# Altium PCB PCB1.pcbdoc (part 2 of 3)
Units mil, origin at the board's own origin, x right, y up, seen from the top; angles counter-clockwise.
Board outline 3937.01 x 3937.01 mil, 6 copper layers (Top Layer, Inner1, Inner2, Inner3, Inner4, Bottom Layer), stack 60.565 mil thick; 226 components, 112 nets, 767 pads, 893 vias.
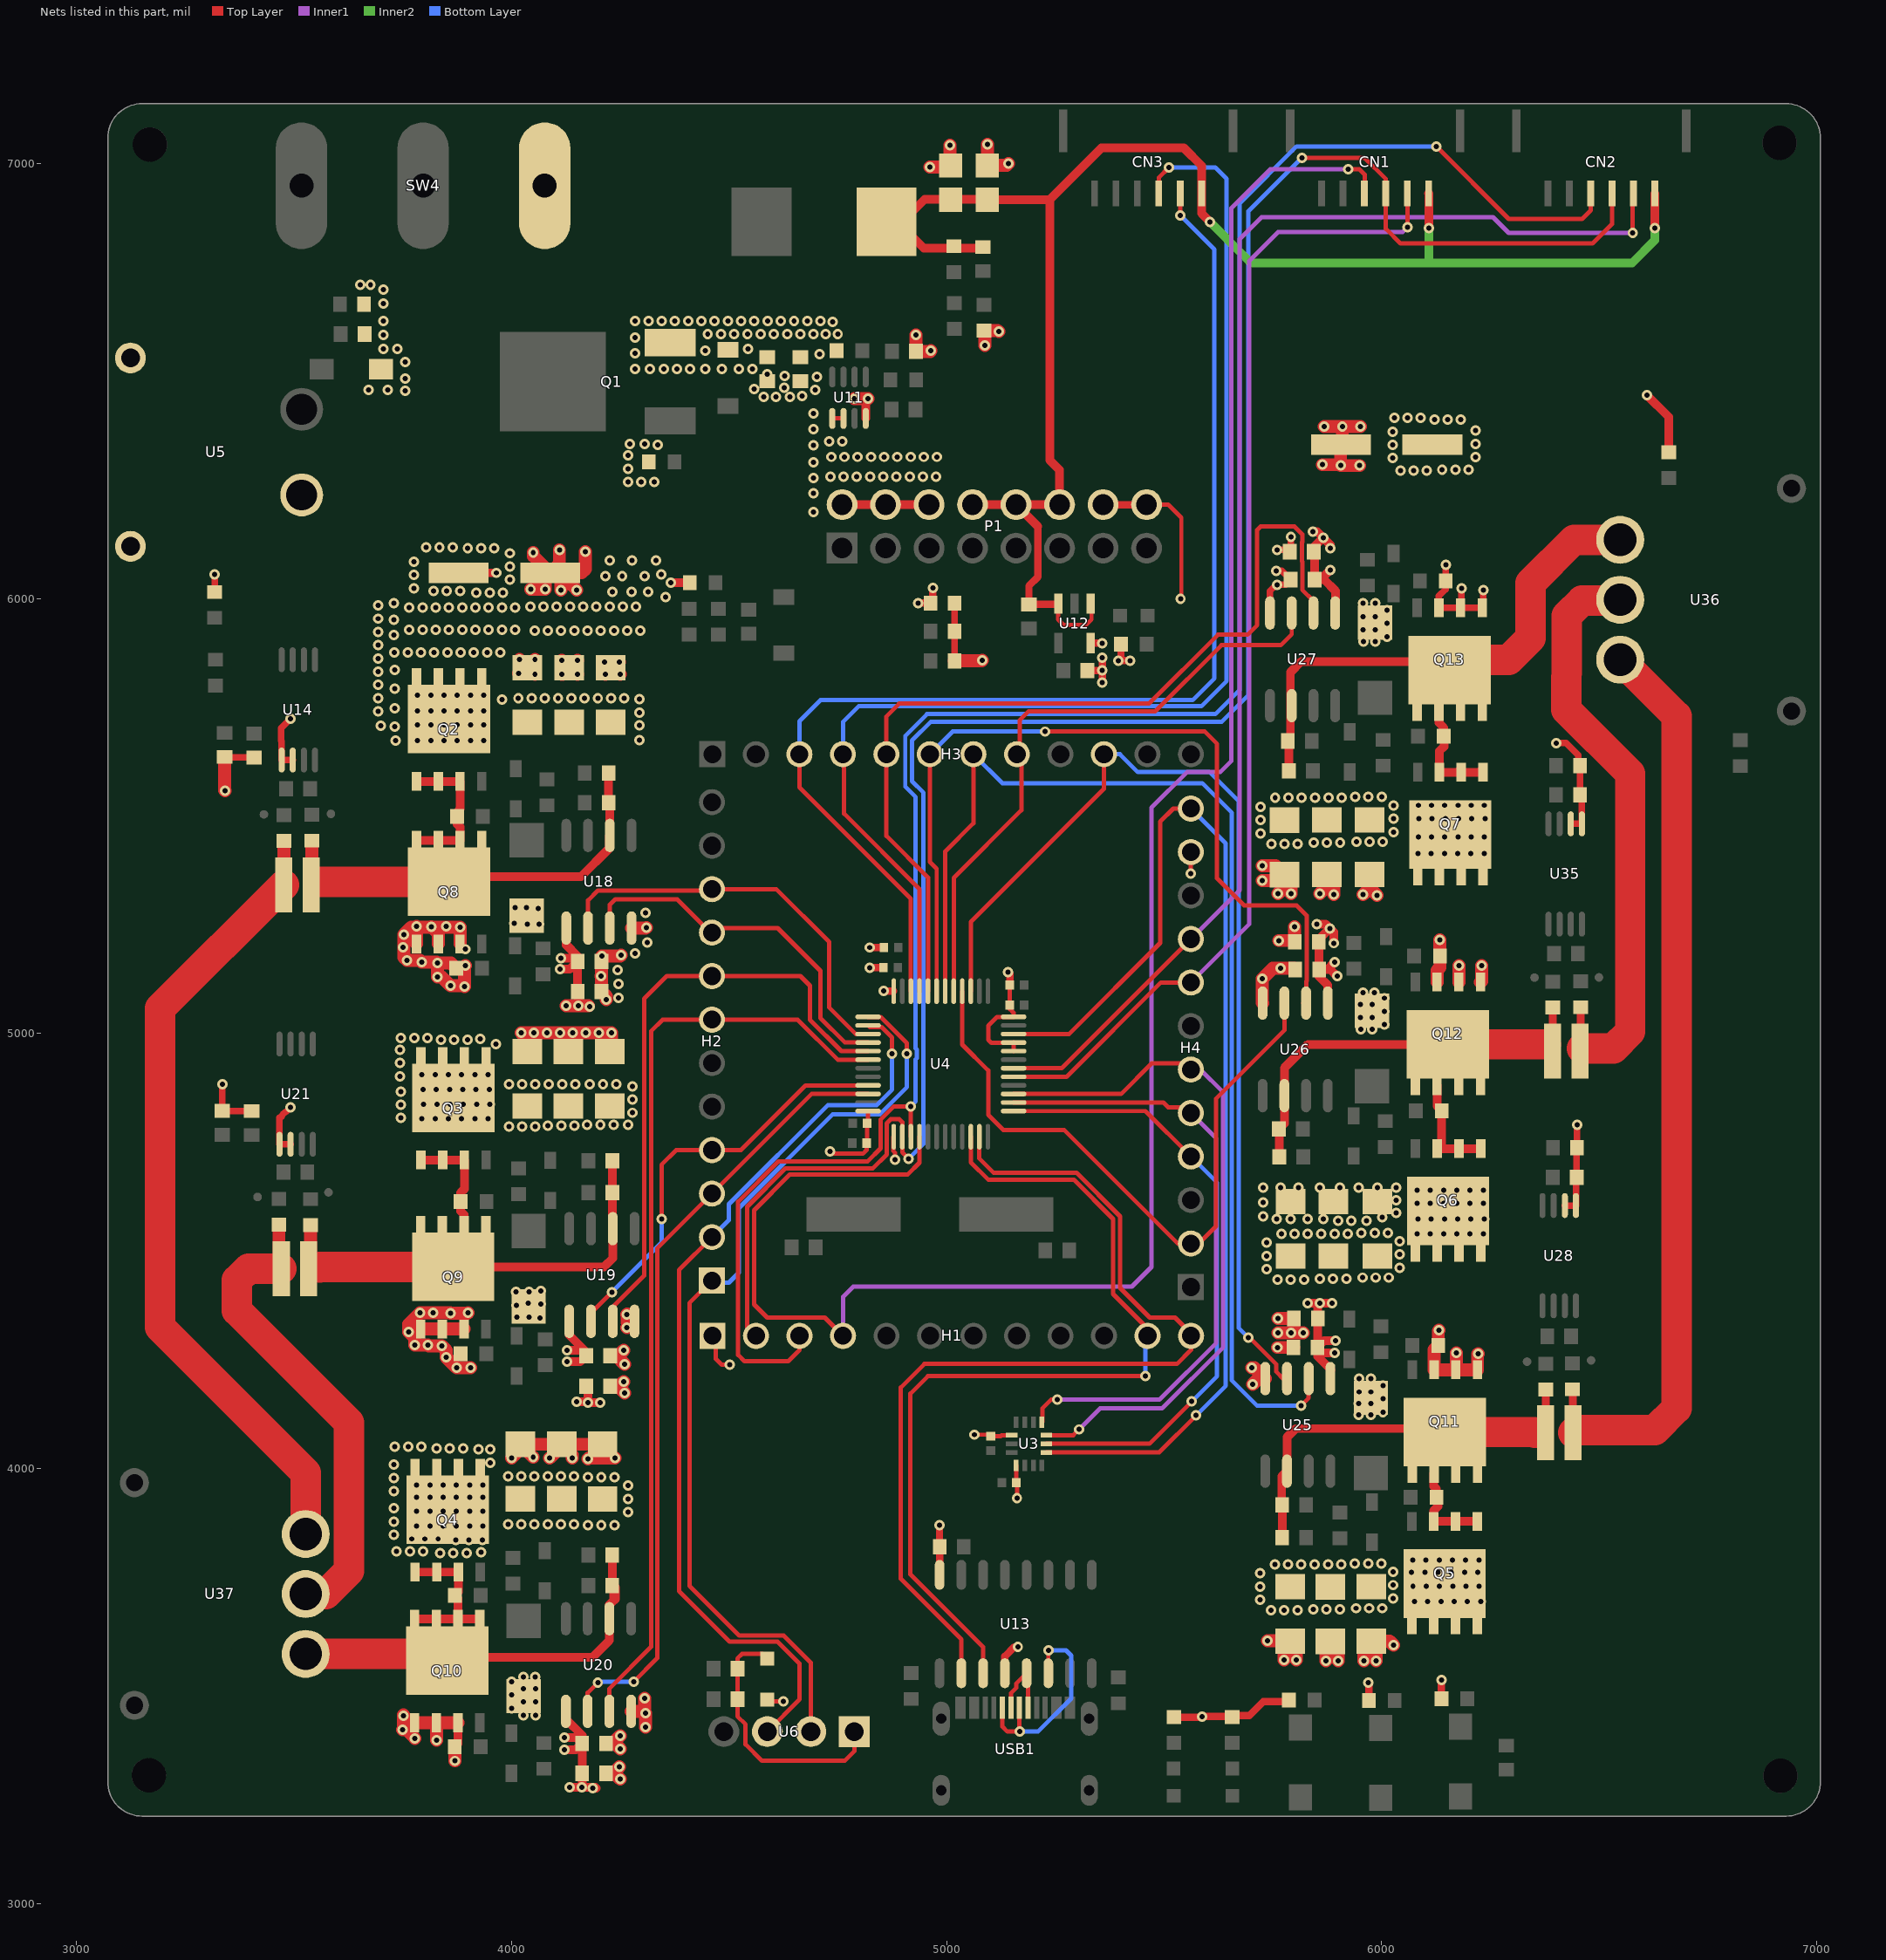
[diagram p6: the nets of this part, all layers, seen from the top]

## Via types
v1: diameter 24.02, hole 12.01, Top Layer to Bottom Layer, 893 vias

## Nets (pads, with @x,y where several pads share a name; then routed paths per layer and width w, separated by ;. In a path a pad name is that pad's centre, name@x,y a point inside that pad or via, vN(x,y) a via of type N, cw(c..) or ccw(c..) an arc to the next point about the centre after c; other vN are vias at no path point) (continued)
PGND: C12.1 C13.1 C17.1 C18.1 C21.1 C22.1 C24.1 C25.1 C27.2 C29.1 C30.2 C31.1 C39.1 C41.1 C42.1 C43.1 C44.1 C45.1 C46.1 C48.2 C51.2 C61.1 C62.1 C63.1 C64.1 C65.1 C66.1 C68.1 C69.1 C70.1 C71.1 C72.1 C73.1 C75.1 C78.1 C81.1 C83.1 C84.1 C85.1 D2.1 Q8.1 Q8.2 Q8.3 Q9.1 Q9.2 Q9.3 Q10.1 Q10.2 Q10.3 Q11.1 Q11.2 Q11.3 Q12.1 Q12.2 Q12.3 Q13.1 Q13.2 Q13.3 R14.1 R16.1 R45.1 R46.1 R47.1 R48.1 R49.1 R50.1 R_DGND1.1 R_DGND2.1 SW4.3 U5.2 U5.3 U5.4 U11.4 U18.4 U19.4 U20.4 U25.4 U26.4 U27.4 | length 6277.5
  Top Layer w15: R_DGND2.1@3317.53,6015.27 v1(3317.53,6055.95) ; U27.4@5743.55,5967.07 5743.55,6017.63 v1@5755.48,6029.56 ; v1(5757.87,6063.95) 5770.79,6063.95 C66.1@5791.09,6043.66 5779.38,6031.95 v1(5759.87,6031.95) ; v1(5759.87,6111.95) 5785.04,6111.95 C65.1@5789.08,6107.91 5791.56,6110.4 v1(5791.56,6141.64) ; v1(6147.87,6077.95) 6147.87,6040.98 R50.1@6147.54,6040.65 6147.54,6021.62 6131.71,6005.78 Q13.3@6131.71,5978.99 Q13.2@6181.71,5978.99 ; v1(6183.87,6023.95) 6183.87,5981.15 Q13.2@6181.71,5978.99 ; v1(6233.87,6019.95) 6233.87,5981.15 Q13.1@6231.71,5978.99 Q13.2@6181.71,5978.99
  Top Layer w20: R47.1@3869.48,3360.1 3877.19,3367.8 Q10.3@3877.19,3415.76 ; U11.4@4814.26,6414.27 4814.26,6454.34 v1(4819.87,6459.95) ; v1(6609.87,6467.95) 6660.22,6417.61 R_DGND1.1@6660.22,6336.5
  Top Layer w30: v1@3751.87,3433.95 v1(3751.87,3431.95) 3751.87,3401.95 v1(3749.87,3399.95) 3757.87,3399.95 v1(3777.87,3379.95) ; Q10.1@3777.19,3415.76 Q10.2@3827.19,3415.76 ; Q8.1@3781.51,5206.13 v1@3781.51,5244.92 ; v1(3781.51,5246.36) v1@3781.51,5244.92 ; Q9.1@3791.01,4320.7 Q9.2@3841.01,4320.7 Q9.3@3891.01,4320.7 ; v1(3815.87,5245.95) v1@3816.91,5244.92 ; v1(3827.87,3375.95) 3827.87,3415.07 Q10.2@3827.19,3415.76 ; Q8.2@3831.51,5206.13 3831.51,5230.32 v1@3816.91,5244.92 ; R47.1@3869.48,3360.1 3869.87,3359.71 v1(3869.87,3327.95) ; R45.1@3872.59,5150.11 3860.75,5161.95 v1(3829.87,5161.95) ; Q10.3@3877.19,3415.76 Q10.2@3827.19,3415.76 ; Q8.3@3881.51,5206.13 v1(3881.51,5244.92) v1@3816.91,5244.92 ; v1(3893.87,5155.95) 3891.87,5153.95 v1(3891.87,5107.95) 3889.87,5109.95 v1(3859.87,5109.95) 3839.87,5129.95 v1(3829.87,5129.95) v1(3829.87,5161.95) ; v1(3899.87,4357.95) 3899.18,4357.26 v1(3859.63,4357.26) 3858.93,4357.95 v1(3819.87,4357.95) v1(3789.87,4357.95) 3763.87,4331.95 v1(3763.87,4313.95) 3777.87,4299.95 v1(3777.87,4283.95) v1(3807.87,4283.95) 3809.87,4281.95 v1(3839.87,4281.95) 3849.87,4271.95 v1(3849.87,4255.95) v1(3873.87,4231.95) v1(3905.87,4231.95) ; v1(3999.87,4023.95) C39.1@4019.91,4043.98 ; v1(4015.87,5827.95) 4023.11,5827.95 C17.1@4036.19,5841.04 ; v1(4017.87,5859.95) 4036.19,5841.64 C17.1@4036.19,5841.04 ; C71.1@4036.09,4958.7 4036.09,4987.73 v1(4021.87,5001.95) v1(4051.62,5001.95) v1(4081.37,5001.95) v1(4111.12,5001.95) v1(4140.87,5001.95) v1(4170.62,5001.95) v1(4200.37,5001.95) v1(4230.12,5001.95) 4230.12,4962.67 C29.1@4226.15,4958.7 ; v1(4043.87,6021.95) v1(4077.87,6021.95) 4077.87,6048.26 C51.2@4088.85,6059.24 ; v1(4049.87,4025.95) C39.1@4019.91,4055.91 C72.1@4115.37,4055.91 ; v1(4049.87,6105.95) 4049.87,6098.21 C51.2@4088.85,6059.24 ; v1(4053.87,5825.95) 4038.79,5841.04 C17.1@4036.19,5841.04 ; v1(4053.87,5859.95) 4053.87,5858.72 C17.1@4036.19,5841.04 ; v1(4087.87,4023.95) 4115.37,4051.45 C72.1@4115.37,4055.91 ; v1(4110.06,6111.95) 4110.06,6080.45 C51.2@4088.85,6059.24 ; v1(4113.65,6019.33) 4113.65,6034.44 ; v1(4115.87,5825.95) 4117.66,5825.95 C68.1@4132.75,5841.04 C68.1@4134.96,5841.04 ; v1(4115.87,5857.95) C68.1@4132.75,5841.08 ; C51.2@4132.07,6037.75 v1(4149.87,6019.95) ; v1(4139.87,4023.95) 4139.87,4031.41 C72.1@4115.37,4055.91 ; v1(4151.87,5825.95) 4136.79,5841.04 C68.1@4134.96,5841.04 ; v1(4151.87,5857.95) C68.1@4134.96,5841.04 ; v1(4169.87,6107.95) 4169.87,6067.95 4161.16,6059.24 C51.2@4088.85,6059.24 ; v1(4175.87,4021.95) 4177.87,4023.95 v1(4237.87,4023.95) ; C42.1@4206.99,5165.92 4206.99,5133.07 v1(4205.87,5131.95) 4206.99,5130.84 C41.1@4206.99,5096.94 4217.87,5086.05 v1(4217.87,5077.95) ; v1(4207.87,5177.95) 4249.87,5177.95 v1(4251.87,5179.95) ; C73.1@4209.24,4055.78 4209.11,4055.91 C72.1@4115.37,4055.91 ; v1(4213.87,5853.95) 4215.14,5853.95 C69.1@4228.05,5841.04 4228.05,5838.13 v1(4215.87,5825.95) ; C45.1@4217.58,3299.34 C45.1@4233.26,3299.34 ; C46.1@4217.58,3368.36 C46.1@4232.28,3368.36 ; C43.1@4226.72,4189.53 4244.3,4189.53 ; C44.1@4226.72,4259.53 C44.1@4240.3,4259.53 ; v1(4247.87,3313.95) C45.1@4233.26,3299.34 ; v1(4247.87,5853.95) 4234.96,5841.04 4234.79,5841.04 v1(4249.87,5825.95) ; v1(4249.87,3285.95) 4236.49,3299.34 C45.1@4233.26,3299.34 ; v1(4249.87,3355.95) 4237.47,3368.36 C46.1@4232.28,3368.36 ; v1(4249.87,3385.95) C46.1@4232.28,3368.36 ; v1(4257.87,4199.95) 4247.45,4189.53 4244.3,4189.53 ; v1(4257.87,4271.95) 4245.45,4259.53 C44.1@4240.3,4259.53 ; v1(4259.87,4173.95) 4244.3,4189.53 ; v1(4259.87,4239.95) C44.1@4240.3,4259.53 ; v1(4264.85,4323.95) v1@4265.87,4323.95 ; 4265.87,4335.95 4265.87,4352.93 v1(4264.85,4353.95) v1@4265.87,4354.98 ; U20.4@4275.02,3441.86 4303.97,3441.86 v1@4305.87,3439.95 ; U18.4@4275.97,5242.59 4308.51,5242.59 v1(4309.87,5243.95) ; v1(4305.87,3471.95) v1@4305.87,3439.95 ; v1(4307.87,3405.95) v1(4307.87,3437.95) v1@4305.87,3439.95 ; v1(4787.84,6459.82) 4797.87,6459.82 4798,6459.95 v1(4819.87,6459.95) ; v1(4929.87,6605.95) 4929.71,6605.79 C18.1@4929.71,6568.47 4962.39,6568.47 v1(4963.87,6569.95) ; v1(4961.87,6991.95) 5005.16,6991.95 C27.2@5009.18,6995.97 5007.87,6997.27 v1(5007.87,7041.95) ; v1(5087.87,6581.95) 5087.87,6614.26 R16.1@5085.77,6616.36 5117.46,6616.36 v1(5119.87,6613.95) ; v1(5093.87,7043.95) 5093.87,6996.04 C30.2@5093.8,6995.97 5137.89,6995.97 v1(5141.87,6999.95) ; v1(5701.87,4231.95) 5707.58,4231.95 U25.4@5732.61,4206.93 5716.85,4206.93 v1(5703.87,4193.95) ; v1(5725.87,5351.95) 5763.58,5351.95 C31.1@5777.02,5365.39 ; v1(5725.87,5385.95) 5756.46,5385.95 C31.1@5777.02,5365.39 ; U26.4@5726.59,5070.32 5725.87,5071.03 v1(5725.87,5125.95) 5749.87,5149.95 v1(5767.87,5149.95) 5798.71,5149.95 C64.1@5801.36,5147.31 ; v1(5737.87,3603.95) 5788.84,3603.95 C78.1@5789.86,3602.94 ; v1(5760.61,4278.46) C62.1@5797.84,4278.46 ; v1(5761.57,4345.15) C61.1@5798.48,4345.15 ; v1(5761.87,4311.95) v1(5791.87,4311.95) ; v1(5761.87,5321.95) C31.1@5777.02,5337.1 ; v1(5763.87,5213.95) 5797.8,5213.95 C63.1@5799.87,5211.88 ; v1(5775.87,3559.95) 5775.87,3588.95 C78.1@5789.86,3602.94 ; v1(5791.87,5321.95) 5791.87,5350.54 C31.1@5777.02,5365.39 ; C61.1@5798.48,4345.15 5798.48,4318.55 v1(5791.87,4311.95) ; v1(5799.87,5245.95) C63.1@5799.87,5211.88 ; C63.1@5800.73,5211.03 C63.1@5799.87,5211.88 ; v1(5803.87,3559.95) 5803.87,3588.92 C78.1@5789.86,3602.94 ; v1(5819.87,4311.95) v1(5791.87,4311.95) ; v1(5857.87,5321.95) C85.1@5874.43,5338.51 ; v1(5863.87,6307.95) 5903.87,6307.95 v1(5905.87,6305.95) ; v1(5867.87,6395.95) v1(5909.87,6395.95) ; v1(5871.87,3557.95) 5871.87,3591.94 C75.1@5882.56,3602.63 5899.87,3585.31 v1(5899.87,3557.95) ; C85.1@5874.43,5365.94 5889.87,5350.5 v1(5889.87,5319.95) ; v1(5949.87,6305.95) v1(5905.87,6305.95) ; v1(5951.87,6395.95) v1(5909.87,6395.95) ; v1(5957.87,5319.95) 5972.44,5334.52 5972.44,5335.38 ; v1(5959.87,3557.95) 5959.87,3586.77 C13.1@5976.31,3603.2 ; C84.1@5972.44,5365.94 5972.44,5335.38 ; v1(5987.87,3557.95) 5987.87,3591.64 C13.1@5976.31,3603.2 ; v1(5989.87,5317.95) 5972.44,5335.38 ; v1(6027.87,3593.95) 6018.62,3603.2 C13.1@5976.31,3603.2 ; Q12.3@6127.61,5118.42 6127.61,5145.69 6134.43,5152.51 R49.1@6134.43,5178.66 6133.87,5179.22 v1(6133.87,5215.95) ; v1(6131.87,4317.95) 6130.42,4316.5 R48.1@6130.42,4283.15 6120.72,4273.45 Q11.3@6120.72,4227.15 Q11.2@6170.72,4227.15 ; v1(6171.87,4265.95) 6171.87,4228.31 Q11.2@6170.72,4227.15 ; Q12.2@6177.61,5118.42 6177.87,5118.69 v1(6177.87,5155.95) ; v1(6221.87,4263.95) 6220.72,4262.8 Q11.1@6220.72,4227.15 Q11.2@6170.72,4227.15 ; Q12.1@6227.61,5118.42 6229.87,5120.69 v1(6229.87,5155.95) ; v1@3781.51,5244.92 3769.57,5244.92 v1(3752.44,5227.78) 3752.44,5175.39 v1(3759.87,5167.95) 3789.87,5167.95 v1(3793.87,5163.95) 3827.87,5163.95 v1(3829.87,5161.95) ; v1@3781.51,5244.92 v1@3816.91,5244.92 ; v1(5905.87,6305.95) 5905.87,6352.75 C48.2@5906.76,6353.63 5909.87,6356.75 v1(5909.87,6395.95)
  other v1: 5900.53,4569.95 5930.64,4569.95 5965.87,4569.95 5759.39,4573.95 5790.89,4573.95 5829.87,4573.95 5865.87,4573.95 6001.87,4577.95 5727.87,4579.59 6033.31,4587.54 5727.87,4611.95 6033.31,4616.77 5727.87,4645.95 5767.87,4646.3 5809.55,4646.01 5857.99,4646.01 5903.87,4645.95 5947.28,4646.01 5990.3,4646.01 6033.31,4646.01 4245.87,5081.95 4245.87,5113.95 4243.87,5145.95 4283.87,5183.95 3893.87,5193.95 3750.21,5198.26 4311.87,5209.95 3850.13,5246.36 4307.87,5277.95 4267.87,6267.95 4297.87,6267.95 4327.87,6267.95 4267.87,6297.95 4267.87,6329.95 4335.87,6353.95 4271.87,6355.95 4305.87,6355.95 4579.87,6463.95 4607.87,6463.95 4639.87,6463.95 4667.87,6465.95 3755.87,6477.87 3671.69,6479.95 3715.87,6479.95 4697.87,6479.95 4557.87,6481.95 4626.98,6485.03 3755.87,6505.74 4701.87,6509.95 4627.87,6511.95 4587.87,6515.95 3755.87,6543.95 3705.87,6573.98 3738,6573.98 3705.87,6605.95 3705.87,6638.37 3705.87,6678.74 3705.87,6710.45 3651.98,6721.95 3675.87,6721.95
PRE_OPA+: C33.1 C34.1 Q2.1 Q2.2 Q2.3 Q8.5 Q8.6 Q8.7 Q8.8 R4.2 R34.1 R55.1 U18.6 | length 1314.2
  Top Layer w20: Q8.8@3781.51,5444.32 Q8.7@3831.51,5444.32 Q8.6@3881.51,5444.32 3881.51,5474.97 3874.95,5481.53 R34.1@3874.95,5499.72 3874.95,5509.49 3881.51,5516.05 Q2.3@3881.51,5579.92 3833.52,5579.92 Q2.2@3831.51,5577.91 ; Q2.1@3781.51,5577.91 3783.52,5579.92 Q2.2@3831.51,5579.92 ; Q8.8@3856.51,5349.24 3868.25,5360.98 4159.65,5360.98 4224.39,5425.73 4224.39,5454.02 U18.6@4225.97,5455.59 4225.97,5527.95 C33.1@4223.05,5530.88 C34.1@4223.05,5598.87
  Top Layer w30: R55.1@3540.98,5343.51 R4.2@3540.98,5443.63
  Top Layer w70: 3559.79,5348.94 3560.09,5349.24 Q8.8@3856.51,5349.24
PRE_OPA+2: C53.1 C54.1 Q5.1 Q5.2 Q5.3 Q11.5 Q11.6 Q11.7 Q11.8 R32.2 R39.1 R57.1 U25.6 | length 1135.8
  Top Layer w18: R57.1@6377.22,4082.21 R32.2@6377.19,4181.7
  Top Layer w20: C54.1@5771.64,3841.27 C53.1@5771.64,3916.27 5770.46,3917.46 5770.46,3981.78 U25.6@5782.61,3993.93 5782.61,4072.03 5802.58,4092.01 6137.75,4092.01 Q11.8@6145.72,4084.04 ; Q11.6@6120.72,3988.96 6119.83,3988.07 6119.83,3959.49 6126.4,3952.91 R39.1@6126.4,3933.78 ; R39.1@6129.87,3933.78 6129.87,3913.31 6120.05,3903.49 Q5.3@6120.05,3878.62 Q5.2@6170.05,3878.62 Q5.1@6220.05,3878.62
  Top Layer w70: Q11.8@6145.72,4084.04 6350.66,4084.04 6352.74,4081.97
PRE_OPA-: R17.2 R55.2 U37.1 | length 1850.1
  Top Layer w30: R55.2@3476.52,5342.05 3476.52,5442.68 R17.2@3476.98,5443.14
  Top Layer w70: R55.2@3476.52,5342.05 3192.35,5057.88 3192.35,4324.92 3526.82,3990.45 U37.1@3526.82,3849.52
PRE_OPA-2: R33.2 R57.2 U36.1 | length 2136.6
  Top Layer w18: R33.2@6439.09,4182.27 6440.22,4181.14 R57.2@6440.22,4082.21
  Top Layer w70: R57.2@6440.22,4082.21 6446.7,4088.69 6628.52,4088.69 6678.02,4138.19 6678.02,5730.31 U36.1@6548.62,5859.71
PRE_OPB+: C35.1 C36.1 Q3.1 Q3.2 Q3.3 Q9.5 Q9.6 Q9.7 Q9.8 R24.2 R35.1 R56.1 U19.6 | length 1262.5
  Top Layer w20: Q3.1@3791.52,4711.31 3793.53,4709.3 Q3.2@3841.52,4709.3 ; Q3.2@3841.52,4711.31 3843.53,4709.3 Q3.3@3891.52,4709.3 3891.52,4642.6 3883.2,4634.28 R35.1@3883.2,4613.75 3883.05,4613.61 3883.05,4591.97 3891.01,4584.01 Q9.6@3891.01,4558.89 ; Q9.8@3866.01,4463.81 4212.69,4463.81 4232.68,4483.8 U19.6@4232.68,4551.57 4231.72,4552.52 C35.1@4231.72,4634.53 C36.1@4231.72,4707.62
  Top Layer w30: R56.1@3537.59,4463.38 R24.2@3537.59,4560.04
  Top Layer w70: 3558.79,4462.45 3560.15,4463.81 Q9.8@3866.01,4463.81
PRE_OPB+2: C55.1 C58.1 Q6.1 Q6.2 Q6.3 Q12.5 Q12.6 Q12.7 Q12.8 R40.1 R44.2 R58.1 U26.6 | length 1187.8
  Top Layer w18: R58.1@6393.51,4959.58 6393.51,5059.75 R44.2@6393.68,5059.91
  Top Layer w20: C58.1@5764.98,4716.46 5764.98,4780.1 C55.1@5763.99,4781.1 5776.59,4793.7 U26.6@5776.59,4857.32 5776.59,4921.2 5830.69,4975.31 Q12.8@6152.61,4975.31 ; Q12.6@6127.61,4880.23 6127.61,4833.51 R40.1@6138.33,4822.79 6138.33,4745.96 Q6.3@6127.92,4735.55 Q6.2@6177.92,4735.55 Q6.1@6227.92,4735.55
  Top Layer w70: Q12.8@6152.61,4975.31 R58.1@6377.78,4975.31
PRE_OPB-: R25.2 R56.2 U37.2 | length 1112.1
  Top Layer w30: R25.2@3465.32,4560.44 3465.32,4465.12 R56.2@3470.82,4459.62
  Top Layer w70: R56.2@3470.82,4459.62 3395.31,4459.62 3368.9,4433.21 3368.9,4363.21 3626.05,4106.06 3626.05,3764.72 3573.05,3711.73 U37.2@3526.82,3711.73
PRE_OPB-2: R51.2 R58.2 U36.2 | length 1373.1
  Top Layer w18: R58.2@6456.51,4959.58 6458.12,4961.19 R51.2@6458.12,5060.71
  Top Layer w70: 6425.02,5818.78 6425.02,5744.49 6571.6,5597.91 6571.6,5004.53 6532.81,4965.74 R58.2@6460.86,4965.74 ; 6425.88,5828.82 6425.88,5960.19 6461.16,5995.47 6546.59,5995.47 U36.2@6548.62,5997.5
SPI1_CS: H4.12 U3.12 U4.22 | length 2621.6
  Top Layer w10: U4.22@5154.27,4999.1 5282.08,4999.1 5491.36,5208.39 5491.36,5487.48 5521.32,5517.44 H4.12@5561.64,5517.44 ; U3.12@5229.62,4037.31 5488.87,4037.31 v1(5573.68,4122.13)
  Bottom Layer w10: H4.12@5561.64,5517.44 5641.95,5437.13 5641.95,4190.39 v1(5573.68,4122.13)
SPI1_MISO: H4.5 U3.1 U4.14 | length 1464
  Top Layer w10: U4.14@5154.27,4841.62 5498.72,4841.62 5509.43,4830.91 5548.17,4830.91 H4.5@5561.64,4817.44 ; U3.1@5219.29,4106.68 5220.3,4107.69 5220.3,4138.19 5240.38,4158.27 v1(5254.43,4158.27)
  Inner1 w10: v1(5254.43,4158.27) 5489.35,4158.27 5619.87,4288.78 5619.87,4759.21 H4.5@5561.64,4817.44
SPI1_MOSI: H4.6 U3.14 U4.15 | length 1614.4
  Top Layer w10: U4.15@5154.27,4861.3 5401.29,4861.3 5471.28,4931.3 5547.78,4931.3 H4.6@5561.64,4917.44 ; U3.14@5229.62,4076.68 5291.31,4076.68 v1(5304.63,4090)
  Inner1 w10: v1(5304.63,4090) 5352.82,4138.19 5495.38,4138.19 5635.93,4278.74 5635.93,4865.04 5583.53,4917.44 H4.6@5561.64,4917.44
SPI1_SCK: H4.4 U3.13 U4.13 | length 1437.2
  Top Layer w10: U4.13@5154.27,4821.93 5457.15,4821.93 H4.4@5561.64,4717.44 ; U3.13@5229.62,4057 5466.4,4057 v1(5563.65,4154.25)
  Bottom Layer w10: H4.4@5561.64,4717.44 5621.87,4657.21 5621.87,4212.48 v1(5563.65,4154.25)
SPI2_CS: CN1.2 H4.8 U4.17 | length 2685.3
  Top Layer w10: U4.17@5154.27,4900.67 5276.01,4900.67 5492.78,5117.44 H4.8@5561.64,5117.44 ; CN1.2@6059.12,6931.58 6059.59,6931.1 v1(6059.59,6853.94)
  Inner1 w10: H4.8@5561.64,5117.44 5696.16,5251.97 5696.16,6776.54 5762.42,6842.8 6048.45,6842.8 v1(6059.59,6853.94)
SPI2_MISO: CN1.4 H1.4 U4.4 | length 4710.9
  Top Layer w10: H1.4@4762.05,4305.18 4720.22,4347.01 4587.82,4347.01 4557.7,4377.13 4557.7,4593.98 4640.06,4676.34 4911.13,4676.34 4937.74,4702.96 U4.4@4937.74,4762.88 ; v1(5923.05,6987.36) 5949.16,6987.36 5961.2,6975.32 5961.2,6932.09 CN1.4@5960.69,6931.58
  Inner1 w10: H1.4@4762.05,4305.18 4762.5,4305.64 4762.5,4395.2 4785.59,4418.29 5426.11,4418.29 5471.28,4463.47 5471.28,5519.61 5553.02,5601.34 5629.32,5601.34 5655.05,5627.07 5655.05,6898.06 5744.35,6987.36 v1(5923.05,6987.36)
SPI3_CS: CN2.2 H4.9 U4.18 | length 3217
  Top Layer w10: U4.18@5154.27,4920.36 5264.56,4920.36 H4.9@5561.64,5217.44 ; v1(6577.62,6840.79) 6577.62,6930.04 CN2.2@6579.16,6931.58
  Inner1 w10: H4.9@5561.64,5217.44 5674.08,5329.88 5674.08,6826.73 5724.28,6876.93 6256.36,6876.93 6292.5,6840.79 v1(6577.62,6840.79)
SPI3_MISO: CN2.4 H1.3 U4.3 | length 4916.1
  Top Layer w10: H1.3@4662.05,4305.18 4662.05,4272.65 4636.01,4246.61 4535.61,4246.61 4521.06,4261.17 4521.06,4613.56 4613.92,4706.42 4818.68,4706.42 4848.37,4736.1 4848.37,4799.65 4848.84,4800.13 4848.84,4802.8 4878.96,4832.91 v1(4918.05,4832.91) U4.3@4918.05,4762.88 ; v1(6125.85,7039.57) 6292.5,6872.91 6461.16,6872.91 6480.73,6892.48 CN2.4@6480.73,6931.58
  Bottom Layer w10: v1(4918.05,4832.91) 4929.16,4844.02 4929.16,4940.95 4932.07,4943.86 4932.07,4962.91 4929.16,4965.82 4929.16,5543.7 4905.18,5567.68 4905.18,5684.36 4955.26,5734.45 5617.86,5734.45 5674.08,5790.67 5674.08,6909.06 5804.59,7039.57 v1(6125.85,7039.57)
SPI23_SCK: CN1.3 CN2.3 H1.2 U4.2 | length 4919.8
  Top Layer w10: H1.2@4562.05,4305.18 4541.64,4325.59 4541.64,4602.01 4629.98,4690.35 4830.77,4690.35 4862.38,4721.97 4862.38,4793.85 4871.93,4803.4 4891.25,4803.4 4898.37,4796.27 U4.2@4898.37,4762.88 4898.37,4727.06 v1(4912.99,4712.44) ; v1(5816.64,7013.47) 5961.2,7013.47 6009.91,6964.76 CN1.3@6009.91,6931.58 6009.91,6850.31 6043.53,6816.69 6485.26,6816.69 6529.95,6861.38 CN2.3@6529.95,6931.58
  Bottom Layer w10: v1(4912.99,4712.44) 4947.23,4746.68 4947.23,5553.74 4920.86,5580.11 4920.86,5673.94 4964.2,5717.28 5632.82,5717.28 5694.16,5778.62 5694.16,6890.98 v1(5816.64,7013.47)
ST-LINK3.3V: C1.1 C2.1 U2.1 U6.1 | length 602.7
  Top Layer w10: U2.1@4587.87,3563.19 4577.11,3573.95 4529.87,3573.95 4519.43,3563.51 C2.1@4519.43,3539.95 C1.1@4519.43,3469.95 4519.43,3430.39 4537.87,3411.95 4537.87,3365.95 4575.87,3327.95 4765.87,3327.95 4788.02,3350.09 U6.1@4788.02,3395.28
SWCLK: H2.2 U4.38 U6.3 | length 2141.4
  Top Layer w10: H2.2@4460.66,4532.17 4385.02,4456.53 4385.02,3718.54 4501.61,3601.95 4611.87,3601.95 4662.11,3551.72 4662.11,3469.37 U6.3@4588.02,3395.28 ; U4.38@4819.63,5018.78 4823.01,5015.4 4850.6,5015.4 4874.94,4991.05 v1(4874.94,4953.39)
  Bottom Layer w10: H2.2@4460.66,4532.17 4499.47,4570.98 4499.47,4608.03 4727.37,4835.93 4839.81,4835.93 4874.94,4871.06 v1(4874.94,4953.39)
SWDIO: H2.1 U4.37 U6.2 | length 2172.6
  Top Layer w10: H2.1@4460.66,4432.17 4409.12,4380.63 4409.12,3730.59 4523.76,3615.95 4625.87,3615.95 4688.02,3553.81 U6.2@4688.02,3395.28 ; U4.37@4819.63,5038.47 4848.34,5038.47 4909.08,4977.74 v1(4909.08,4953.39)
  Bottom Layer w10: H2.1@4460.66,4432.17 4465.51,4427.32 4499.47,4427.32 4522.54,4450.39 4522.54,4598.98 4738.41,4814.84 4846.83,4814.84 4909.08,4877.09 v1(4909.08,4953.39)
TIM1_CH1_PA+: H3.7 U4.30 U25.2 | length 2779.8
  Top Layer w10: U4.30@4996.79,5097.52 4996.79,5418.58 5061.84,5483.63 H3.7@5061.84,5642.33 ; v1(5814.63,4144.21) 5832.61,4162.19 U25.2@5832.61,4206.93
  Bottom Layer w10: H3.7@5061.84,5642.33 5128.34,5575.83 5587.74,5575.83 5656.01,5507.56 5656.01,4202.44 5714.24,4144.21 v1(5814.63,4144.21)
TIM1_CH1N_PA-: H3.10 U4.27 U25.3 | length 2406.7
  Top Layer w10: U4.27@5055.85,5097.52 5055.85,5256.77 5361.84,5562.76 H3.10@5361.84,5642.33 ; v1(5694.16,4300.83) 5697.27,4300.83 5758.41,4239.69 5758.41,4222.52 5774,4206.93 U25.3@5782.61,4206.93
  Bottom Layer w10: H3.10@5361.84,5642.33 5398.76,5642.33 5439.75,5601.34 5578.82,5601.34 5579.4,5601.93 5603.8,5601.93 5672.07,5533.66 5672.07,4322.91 v1(5694.16,4300.83)
TIM1_CH2_PB+: H3.6 U4.31 U26.2 | length 2005.5
  Top Layer w10: H3.6@4961.84,5642.33 4961.84,5394.56 4977.35,5379.06 4977.35,5097.76 U4.31@4977.11,5097.52 ; v1@5220.3,5694.29 5593.76,5694.29 5621.87,5666.18 5621.87,5357.01 5684.16,5294.72 5804.59,5294.72 5828.09,5271.22 5828.09,5121.45 5827.11,5120.47 5827.11,5076.86 U26.2@5820.56,5070.32
  Bottom Layer w10: H3.6@4961.84,5642.33 5013.81,5694.29 v1(5226.32,5694.29)
TIM1_CH2N_PB-: H4.2 U4.28 U26.3 | length 1549.7
  Top Layer w10: U4.28@5036.16,5097.52 5036.16,4974.88 5095.81,4915.24 5095.81,4813.31 5130.34,4778.78 5270.42,4778.78 5531.76,4517.44 H4.2@5561.64,4517.44 5579.47,4517.44 5619.87,4557.84 5619.87,4850.98 5776.59,5007.7 U26.3@5776.59,5070.32
TIM1_CH3_PC+: H3.5 U4.32 U27.2 | length 2135.5
  Top Layer w10: U4.32@4957.42,5097.52 4957.42,5358.82 4861.84,5454.4 H3.5@4861.84,5642.33 4861.84,5729.38 4891.01,5758.54 5465.26,5758.54 5623.88,5917.17 5692.15,5917.17 5714.24,5939.25 5714.24,6158.11 5722.06,6165.93 5799.78,6165.93 5817.64,6148.07 5817.64,6130.36 5817.47,6130.18 5817.47,6085.65 5817.82,6085.3 5817.82,6020.4 5843.55,5994.66 U27.2@5843.55,5967.07
TIM1_CH3N_PC-: H3.8 U4.29 U27.3 | length 1450.5
  Top Layer w10: U4.29@5016.48,5097.52 5016.48,5357.96 5172.11,5513.58 5172.11,5632.06 H3.8@5161.84,5642.33 5168.09,5648.58 5168.09,5720.39 5188.17,5740.47 5479.31,5740.47 5631.91,5893.07 5768.45,5893.07 5793.55,5918.17 U27.3@5793.55,5967.07
TIM4_CH1: CN3.2 H3.3 U4.34 | length 2869
  Top Layer w10: H3.3@4661.84,5642.33 4661.84,5566.06 4918.05,5309.85 U4.34@4918.05,5097.52 ; CN3.2@5537.07,6931.58 5537.07,6881.42 v1(5537.54,6880.95)
  Bottom Layer w10: H3.3@4661.84,5642.33 4661.84,5718.12 4710.3,5766.58 5565.65,5766.58 5615.85,5816.77 5615.85,6802.64 v1(5537.54,6880.95)
TIM4_CH2: CN3.3 H3.4 U4.33 | length 2980.4
  Top Layer w10: H3.4@4761.84,5642.33 4764.51,5639.66 4764.51,5505.55 4937.74,5332.32 U4.33@4937.74,5097.52 ; CN3.3@5487.86,6931.58 5487.86,6967.8 v1(5511.44,6991.38)
  Bottom Layer w10: H3.4@4761.84,5642.33 4761.84,5716.38 4797.98,5752.52 5585.73,5752.52 5643.96,5810.75 5643.96,6965.28 5617.86,6991.38 v1(5511.44,6991.38)
TIM8_CH1_PA+: H2.10 U4.39 U18.2 | length 944.4
  Top Layer w10: U18.2@4175.97,5242.59 4175.97,5306.54 4198.29,5328.86 4457.35,5328.86 H2.10@4460.66,5332.17 4608.6,5332.17 4730.38,5210.39 4730.38,5059.8 4791.08,4999.1 U4.39@4819.63,4999.1
TIM8_CH1N_PA-: H2.9 U4.40 U18.3 | length 861.1
  Top Layer w10: U18.3@4225.97,5242.59 4225.97,5296.3 4238.45,5308.78 4381.01,5308.78 4457.62,5232.17 H2.9@4460.66,5232.17 4471.01,5242.52 4611.91,5242.52 4710.3,5144.13 4710.3,5035.71 4766.52,4979.49 4819.56,4979.49 U4.40@4819.63,4979.41
TIM8_CH2_PB+: H2.4 U4.45 U19.2 | length 977.4
  Top Layer w10: U19.2@4182.68,4338.57 4182.68,4357.5 v1(4230.42,4405.24) ; v1(4344.87,4573.9) 4344.87,4698.39 4378.65,4732.17 H2.4@4460.66,4732.17 4527.23,4732.17 4676.06,4880.99 U4.45@4819.63,4880.99
  Bottom Layer w10: v1(4230.42,4405.24) 4344.87,4519.69 v1(4344.87,4573.9)
TIM8_CH2N_PB-: H2.8 U4.41 U19.3 | length 1425.1
  Top Layer w10: U19.3@4232.68,4338.57 4232.68,4371.36 4304.85,4443.53 4304.85,5080.02 4357,5132.17 H2.8@4460.66,5132.17 4664.12,5132.17 4686.2,5110.08 4686.2,5031.69 4758.16,4959.73 U4.41@4819.63,4959.73
TIM8_CH3_PC+: H2.3 U4.46 U20.2 | length 1809.6
  Top Layer w10: U20.2@4175.02,3441.86 4175.02,3484.44 v1(4198.29,3507.72) ; v1(4280.61,3509.72) 4334.79,3563.9 4334.79,4506.3 H2.3@4460.66,4632.17 4689.79,4861.3 U4.46@4819.63,4861.3
  Bottom Layer w10: v1(4198.29,3507.72) 4200.3,3509.72 v1(4280.61,3509.72)
TIM8_CH3N_PC-: H2.7 U4.42 U20.3 | length 2151.4
  Top Layer w10: U20.3@4225.02,3441.86 4225.02,3494.29 4320.77,3590.04 4320.77,5005.59 4347.35,5032.17 H2.7@4460.66,5032.17 4657.62,5032.17 4749.74,4940.04 U4.42@4819.63,4940.04
USART2_RX: H1.12 U4.11 U13.2 | length 2254.6
  Top Layer w10: U13.2@5034.05,3529.44 5034.05,3607.62 4895.02,3746.65 4895.02,4186.38 4949.24,4240.59 5529.51,4240.59 5562.05,4273.13 H1.12@5562.05,4305.18 5562.05,4310.46 5525.5,4347.01 5467.27,4347.01 5399,4415.28 5399,4579.92 5298.61,4680.32 5107.86,4680.32 5075.53,4712.64 U4.11@5075.53,4762.88
USART2_TX: H1.11 U4.10 U13.3 | length 2104.7
  Top Layer w10: U4.10@5055.85,4762.88 5055.85,4704.21 5095.81,4664.25 5292.58,4664.25 5382.94,4573.9 5382.94,4401.22 5462.05,4322.11 H1.11@5462.05,4305.18 ; U13.3@5084.05,3529.44 5084.05,3589.75 4917.11,3756.69 4917.11,4172.32 4957.27,4212.48 v1(5457.23,4212.48)
  Bottom Layer w10: v1(5457.23,4212.48) 5457.23,4300.36 H1.11@5462.05,4305.18
USB_DM: U13.6 USB1.A7 USB1.B7 | length 502
  Top Layer w10: USB1.B7@5128.37,3450.59 5128.37,3406.89 5139.98,3395.28 v1(5168.09,3395.28) 5167.74,3395.63 USB1.A7@5167.74,3450.59 ; U13.6@5234.05,3529.44 5234.05,3581.71 v1(5234.35,3582.01)
  Bottom Layer w10: v1(5168.09,3395.28) 5210.26,3395.28 5286.56,3471.58 5286.56,3569.96 5274.51,3582.01 v1(5234.35,3582.01)
USB_DP: U13.5 USB1.A6 USB1.B6 | length 174
  Top Layer w10: USB1.A6@5148.06,3450.59 5148.06,3483.67 5160.06,3495.67 5160.06,3505.45 U13.5@5184.05,3529.44 5187.43,3526.07 USB1.B6@5187.43,3450.59
VCC_5V: C19.1 C26.1 C27.1 C30.1 CN1.1 CN2.1 CN3.1 L1.1 P1.8 P1.10 P1.12 R15.2 U12.1 U12.3 | length 3920.5
  Top Layer w10: U12.3@5256.73,5988.61 5256.73,5952.48 5270.03,5939.18 5320.23,5939.18 5333.32,5952.27 5333.32,5986.81 U12.1@5331.53,5988.61
  Top Layer w17: 5209.87,6166.13 5209.87,6049.95 5189.4,6029.48 C19.1@5189.4,5986.66 5254.77,5986.66 U12.3@5256.73,5988.61
  Top Layer w20: L1.1@4862.03,6866.89 L1.1@4886.94,6866.89 ; P1.8@5059.87,6216.14 P1.10@5159.87,6216.14 ; C26.1@5083.76,6808.11 5081.6,6805.95 4947.87,6805.95 L1.1@4886.94,6866.89 ; 5209.87,6166.13 P1.10@5159.87,6216.14 ; v1(5605.87,6865.95) 5586.28,6885.55 CN3.1@5586.28,6931.58 5586.28,6995.55 5545.87,7035.95 5355.87,7035.95 5237.15,6917.23 ; CN1.1@6108.33,6931.58 6108.87,6931.03 v1(6108.87,6851.95) ; v1(6627.87,6851.95) 6627.87,6931.08 CN2.1@6628.37,6931.58 ; L1.1@4886.94,6866.89 4898.81,6866.89 4949.87,6917.95 5093.07,6917.95 C30.1@5093.8,6917.23 5237.15,6917.23 ; P1.10@5159.87,6216.14 P1.12@5259.87,6216.14 5259.87,6295.95 5237.15,6318.68 5237.15,6917.23
  Inner2 w20: v1(5605.87,6865.95) 5699.87,6771.95 6108.87,6771.95 ; v1(6108.87,6851.95) 6108.87,6771.95 ; v1(6627.87,6851.95) 6627.87,6823.95 6575.87,6771.95 6108.87,6771.95
VCC_12V: C12.2 C13.2 C17.2 C21.2 C22.2 C29.2 C31.2 C39.2 C41.2 C42.2 C43.2 C44.2 C45.2 C46.2 C48.1 C51.1 C61.2 C62.2 C63.2 C64.2 C65.2 C66.2 C68.2 C69.2 C70.2 C71.2 C72.2 C73.2 C75.2 C78.2 C81.2 C83.2 C84.2 C85.2 D1.1 P1.2 P1.4 P1.6 Q1.3 Q2.5 Q2.6 Q2.7 Q2.8 Q3.5 Q3.6 Q3.7 Q3.8 Q4.5 Q4.6 Q4.7 Q4.8 Q5.5 Q5.6 Q5.7 Q5.8 Q6.5 Q6.6 Q6.7 Q6.8 Q7.5 Q7.6 Q7.7 Q7.8 R10.2 R52.2 U11.1 U11.2 U15.1 U16.1 U17.1 U18.1 U19.1 U20.1 U22.1 U23.1 U24.1 U25.1 U26.1 U27.1 | length 2266.5
  Top Layer w10: U11.1@4737.48,6414.27 U11.2@4763.07,6414.27
  Top Layer w20: C51.1@3878.61,6059.24 v1@3965.35,6059.24 ; v1(4111.87,5147.95) 4133.9,5147.95 C42.2@4151.87,5165.92 ; v1(4113.33,5173.6) 4144.19,5173.6 C42.2@4151.87,5165.92 ; v1(4121.87,3353.95) 4148.05,3353.95 C46.2@4162.46,3368.36 ; v1(4121.87,3381.95) 4148.86,3381.95 C46.2@4162.46,3368.36 ; U20.1@4125.02,3441.86 4125.02,3423.8 4162.46,3386.36 C46.2@4162.46,3368.36 ; U18.1@4125.97,5242.59 4125.97,5203.85 4151.87,5177.96 C42.2@4151.87,5165.92 ; v1(4127.87,4245.95) 4158.03,4245.95 C44.2@4171.6,4259.53 ; v1(4127.87,4271.95) 4159.18,4271.95 C44.2@4171.6,4259.53 ; U19.1@4132.68,4338.57 4132.68,4307.15 4171.6,4268.22 C44.2@4171.6,4259.53 ; v1@4141.22,3266.93 v1(4161.22,3266.93) 4162.46,3268.17 C45.2@4162.46,3299.34 C46.2@4162.46,3368.36 ; v1(4149.87,4153.95) 4173.87,4153.95 v1(4175.87,4151.95) ; v1(4153.87,5063.95) 4153.87,5094.93 C41.2@4151.87,5096.94 C42.2@4151.87,5165.92 ; v1@4169.22,3266.93 4192.84,3266.93 v1@4194.64,3265.13 ; C43.2@4171.6,4189.53 4175.87,4185.26 v1(4175.87,4151.95) ; v1(4203.87,4151.95) v1(4175.87,4151.95) ; v1(4366.33,6036.66) R52.2@4409.77,6036.66 ; P1.2@4759.87,6216.14 P1.4@4859.87,6216.14 P1.6@4959.87,6216.14 ; v1(5830.47,4380.71) 5885.11,4380.71 v1(5885.87,4379.95) ; v1(5842.63,6153.9) 5851.92,6153.9 v1(5865.87,6139.95) ; C63.2@5851.08,5215.79 C63.2@5855.85,5211.03 ; v1(5851.08,5251.95) 5871.08,5251.95 v1(5881.08,5241.95) ; v1(5857.87,4379.95) 5853.6,4375.67 C61.2@5853.6,4345.15 5852.96,4344.52 C62.2@5852.96,4278.46 ; U26.1@5876.59,5070.32 5876.59,5111.24 5856.48,5131.35 C64.2@5856.48,5147.31 ; v1(5881.87,6065.95) C66.2@5859.58,6043.66 ; v1(5881.87,6115.95) 5881.87,6123.95 v1(5865.87,6139.95) ; U25.1@5883.33,4225.83 5883.33,4227.83 5852.96,4258.19 C62.2@5852.96,4278.46 ; v1(5889.87,5207.95) 5889.87,5233.16 v1(5881.08,5241.95) ; v1(5891.87,4265.95) 5865.47,4265.95 C62.2@5852.96,4278.46 ; v1(5891.87,5163.95) 5875.23,5147.31 ; U27.1@5893.55,5967.07 5893.87,5967.4 5893.87,6017.95 5868.17,6043.66 C66.2@5859.58,6043.66 ; v1(5893.87,4293.95) 5868.46,4293.95 C62.2@5852.96,4278.46 ; v1(5897.87,5131.95) 5882.52,5147.31 5875.23,5147.31 ; C63.2@5855.85,5211.03 5856.48,5210.4 C64.2@5856.48,5147.31 ; C63.2@5855.85,5211.03 5855.85,5216.72 v1(5881.08,5241.95) ; C64.2@5856.48,5147.31 5875.23,5147.31 ; C66.2@5859.58,6043.66 C66.2@5846.21,6043.66 5846.21,6105.91 C65.2@5844.2,6107.91 5844.2,6118.28 v1(5865.87,6139.95)
  Top Layer w30: v1(4125.87,5063.95) v1(4153.87,5063.95) v1@4176.83,5063.95
  other v1: 4186.64,3265.13 4133.22,3266.93 4027.57,3432.95 4055.13,3432.95 4000.02,3448.95 4027.57,3463.37 4055.13,3463.37 4000.02,3479.37 4027.57,3493.79 4055.13,3493.79 4000.02,3509.79 4027.57,3520.53 4054.18,3520.53 5745.77,3674.61 5776.2,3674.61 5806.62,3674.61 5843.18,3676.74 5873.6,3676.74 5904.02,3676.74 5941.2,3678.88 5971.62,3678.88 6002.04,3678.88 6075.87,3693.95 6106.29,3693.95 6136.72,3693.95 6167.14,3693.95 6197.56,3693.95 6227.98,3693.95 5720.89,3698.45 6027.05,3701.61 5720.89,3728.87 6072.29,3729.6 6102.71,3729.6 6133.13,3729.6 6163.55,3729.6 6193.97,3729.6 6224.39,3729.6 6027.05,3732.04 5720.89,3759.29 6068.96,3761.45 6099.39,3761.45 6129.81,3761.45 6160.23,3761.45 6190.65,3761.45 6221.07,3761.45 6027.05,3762.46 5754.63,3780.04 5785.05,3780.04 5815.47,3780.04 5846.63,3780.04 5877.05,3780.04 5907.47,3780.04 5938.63,3782.04 5969.05,3782.04 5999.47,3782.04 6071.87,3789.95 6102.29,3789.95 6132.72,3789.95 6163.14,3789.95 6193.56,3789.95 6223.98,3789.95 3835.87,3805.95 3866.29,3805.95 3896.72,3805.95 3929.87,3807.95 3735.87,3809.95 3766.29,3809.95 3796.72,3809.95 3871.87,3835.95 3902.29,3835.95 3932.72,3835.95 3770.45,3838.3 3800.87,3838.3 3831.29,3838.3 3729.87,3847.95 3781.87,3867.95 3812.29,3867.95 3842.72,3867.95 3873.14,3867.95 3903.56,3867.95 3933.98,3867.95 4175.87,3869.95 4206.29,3869.95 4236.72,3869.95 3991.87,3871.95 4022.29,3871.95 4052.72,3871.95 4083.14,3871.95 4113.56,3871.95 4143.98,3871.95 3729.87,3878.37 4267.87,3899.95 3781.87,3901.95 3812.29,3901.95 3842.72,3901.95 3873.14,3901.95 3903.56,3901.95 3933.98,3901.95 3729.87,3908.79 4267.87,3930.37 3781.87,3933.95 3812.29,3933.95 3842.72,3933.95 3873.14,3933.95 3903.56,3933.95 3933.98,3933.95 3729.87,3947.95 4267.87,3960.79 3781.87,3961.95 3812.29,3961.95 3842.72,3961.95 3873.14,3961.95 3903.56,3961.95 3933.98,3961.95 3729.87,3978.37 4175.87,3979.95 4206.29,3979.95 4236.72,3979.95 3991.87,3981.95 4022.29,3981.95 4052.72,3981.95 4083.14,3981.95 4113.56,3981.95 4143.98,3981.95 3729.87,4008.79 3951.06,4013.68 3923.87,4043.95 3951.06,4043.95 3827.87,4045.95 3858.29,4045.95 3888.72,4045.95 3731.87,4049.95 3762.29,4049.95 3792.72,4049.95 5947.87,4123.95 5975.87,4123.95 6003.12,4129.78 5947.87,4149.95 5975.87,4149.95 6003.12,4160.2 5948,4176.2 5975.56,4176.2 6003.12,4190.62 5948,4206.62 5975.56,4206.62 4065.87,4345.95 4011.87,4347.95 4039.87,4347.95 4011.69,4375.54 4067.87,4377.95 4037.87,4379.95 4009.87,4405.95 4039.87,4405.95 4067.87,4407.95 5760.81,4434.66 5791.23,4434.66 5821.65,4434.66 5858.22,4436.8 5888.64,4436.8 5919.06,4436.8 5956.23,4438.93 5986.65,4438.93 6017.07,4438.93 5735.92,4458.51 6042.08,4461.67 5735.92,4488.93 6042.08,4492.09 5735.92,4519.35 6042.08,4522.51 5769.66,4540.09 5800.08,4540.09 5830.5,4540.09 5861.66,4540.09 5892.08,4540.09 5922.5,4540.09 6081.87,4539.95 6112.29,4539.95 6142.72,4539.95 6173.14,4539.95 6203.56,4539.95 6233.98,4539.95 5953.66,4542.09 5984.08,4542.09 6014.5,4542.09 6083.79,4573.44 6114.21,4573.44 6144.63,4573.44 6175.05,4573.44 6205.47,4573.44 6235.89,4573.44 6081.87,4609.95 6112.29,4609.95 6142.72,4609.95 6173.14,4609.95 6203.56,4609.95 6233.98,4609.95 6081.87,4639.95 6112.29,4639.95 6142.72,4639.95 6173.14,4639.95 6203.56,4639.95 6233.98,4639.95 3993.87,4785.95 4024.29,4785.95 4054.72,4785.95 4083.87,4787.95 4114.29,4787.95 4144.72,4787.95 4173.87,4789.95 4204.29,4789.95 4234.72,4789.95 4267.87,4789.95 3793.87,4803.95 3824.29,4803.95 3854.72,4803.95 3885.14,4803.95 3915.56,4803.95 3945.98,4803.95 3745.87,4805.95 4277.87,4817.95 3745.87,4836.37 3797.87,4837.95 3828.29,4837.95 3858.72,4837.95 3889.14,4837.95 3919.56,4837.95 3949.98,4837.95 4277.87,4848.37 3745.87,4866.79 3796.76,4871.4 3827.18,4871.4 3857.61,4871.4 3888.03,4871.4 3918.45,4871.4 3948.87,4871.4 4277.87,4878.79 3993.87,4883.95 4024.29,4883.95 4054.72,4883.95 4085.87,4883.95 4116.29,4883.95 4146.72,4883.95 4179.87,4883.95 4210.29,4883.95 4240.72,4883.95 3743.87,4901.95 3793.87,4905.95 3824.29,4905.95 3854.72,4905.95 3885.14,4905.95 3915.56,4905.95 3945.98,4905.95 3743.87,4932.37 3743.87,4962.79 3963.87,4975.95 3837.87,4985.95 3868.29,4985.95 3898.72,4985.95 3927.87,4987.95 3745.87,4989.95 3776.29,4989.95 3806.72,4989.95 5952.37,5010.05 5978.97,5010.05 6006.53,5020.79 5951.41,5036.79 5978.97,5036.79 6006.53,5051.21 4179.87,5061.95 5951.41,5067.21 5978.97,5067.21 6006.53,5081.63 5957.74,5094.42 5983.87,5093.95 4035.87,5251.95 4063.87,5251.95 4005.87,5253.95 4061.87,5287.95 4007.87,5289.95 4033.87,5289.95 6083.87,5413.95 6114.29,5413.95 6144.72,5413.95 6175.14,5413.95 6205.56,5413.95 6235.98,5413.95 5746.6,5436.52 5777.02,5436.52 5807.44,5436.52 5844.01,5438.66 5874.43,5438.66 5904.85,5438.66 5942.02,5440.79 5972.44,5440.79 6002.87,5440.79 6084.46,5451.99 6114.88,5451.99 6145.3,5451.99 6175.72,5451.99 6206.14,5451.99 6236.56,5451.99 5721.72,5460.37 6027.87,5463.53 5721.72,5490.79 6027.87,5493.95 6085.87,5493.95 6116.29,5493.95 6146.72,5493.95 6177.14,5493.95 6207.56,5493.95 6237.98,5493.95 5721.72,5521.21 6027.87,5524.37 6084.46,5524.82 6114.88,5524.82 6145.3,5524.82 6175.72,5524.82 6206.14,5524.82 6236.56,5524.82 5755.45,5541.95 5785.87,5541.95 5816.29,5541.95 5847.45,5541.95 5877.87,5541.95 5908.29,5541.95 5939.45,5543.95 5969.87,5543.95 6000.29,5543.95 3733.87,5673.95 3783.87,5673.95 3814.29,5673.95 3844.72,5673.95 3875.14,5673.95 3905.56,5673.95 3935.98,5673.95 4293.87,5674.73 3731.87,5705.74 3699.87,5707.95 4293.87,5708.88 3783.87,5709.95 3814.29,5709.95 3844.72,5709.95 3875.14,5709.95 3905.56,5709.95 3935.98,5709.95 4293.87,5737.95 3693.87,5741.02 3784.04,5742.03 3814.46,5742.03 3844.88,5742.03 3875.31,5742.03 3905.73,5742.03 3936.15,5742.03 3731.87,5747.49 3977.87,5767.95 4293.87,5768.66 3693.87,5771.44 4015.76,5770.93 4046.18,5770.93 4076.6,5770.93 4107.02,5770.93 4137.44,5770.93 4167.86,5770.93 4198.28,5770.93 4228.7,5770.93 4259.12,5770.93 3783.87,5777.95 3814.29,5777.95 3844.72,5777.95 3875.14,5777.95 3905.56,5777.95 3935.98,5777.95 3731.87,5793.04 3693.87,5801.86 3693.87,5832.28 3731.87,5835.95 3693.87,5862.7 3730.94,5875.95 3761.36,5875.95 3791.78,5875.95 3822.2,5875.95 3852.62,5875.95 3883.05,5875.95 3913.47,5875.95 3943.89,5875.95 3974.31,5875.95 3693.87,5893.12 5958.6,5901.8 5985.2,5901.8 6012.76,5912.54 3729.87,5915.95 3693.87,5923.55 4052.94,5925.95 4083.36,5925.95 4113.78,5925.95 4144.2,5925.95 4174.62,5925.95 4205.05,5925.95 4235.47,5925.95 4265.89,5925.95 4296.31,5925.95 3764.94,5927.95 3795.36,5927.95 3825.78,5927.95 3856.2,5927.95 3886.62,5927.95 3917.05,5927.95 3947.47,5927.95 3977.89,5927.95 4008.31,5927.95 5957.64,5928.54 5985.2,5928.54 6012.76,5942.96 3729.87,5951.02 3693.87,5953.97 5957.64,5958.96 5985.2,5958.96 6012.76,5973.38 3764.94,5979.95 3795.36,5979.95 3825.78,5979.95 3856.2,5979.95 3886.62,5979.95 3917.05,5979.95 3947.47,5979.95 3977.89,5979.95 4008.31,5979.95 4042.94,5981.95 4073.36,5981.95 4103.78,5981.95 4134.2,5981.95 4164.62,5981.95 4195.05,5981.95 4225.47,5981.95 4255.89,5981.95 4286.31,5981.95 3693.87,5984.39 3729.87,5989.45 5957.64,5989.38 5985.2,5989.38 4353.87,6003.95 3919.45,6013.95 3949.87,6013.95 3980.29,6013.95 4231.87,6015.95 4275.76,6015.95 4314.19,6015.95 3820.78,6017.42 3851.2,6017.42 3881.62,6017.42 3775.87,6023.95 3995.87,6043.53 4215.87,6051.95 4254.42,6051.95 4305.65,6051.95 3775.87,6054.37 4343.87,6055.95 3965.36,6059.25 3995.87,6073.95 3775.87,6084.79 4225.87,6087.95 4276.83,6087.95 4332.34,6087.95 3995.87,6104.37 3899.45,6115.95 3929.87,6115.95 3960.29,6115.95 3803.87,6117.95 3834.29,6117.95 3864.72,6117.95 4693.87,6199.48 4693.87,6242.18 4693.87,6277.76 4732.94,6279.95 4763.36,6279.95 4793.78,6279.95 4824.2,6279.95 4854.62,6279.95 4885.05,6279.95 4915.47,6279.95 4945.89,6279.95 4976.31,6279.95 6043.45,6293.95 6073.87,6293.95 6104.29,6293.95 6139.45,6295.95 6169.87,6295.95 6200.29,6295.95 4693.87,6313.34 6025.38,6323.2 4734.94,6325.95 4765.36,6325.95 4795.78,6325.95 4826.2,6325.95 4856.62,6325.95 4887.05,6325.95 4917.47,6325.95 4947.89,6325.95 4978.31,6325.95 6215.87,6325.53 4693.87,6352.25 6025.38,6353.62 6215.87,6355.95 4730.01,6361.95 4760.43,6361.95 6025.38,6384.04 6215.87,6386.37 4693.87,6389.25 6121.45,6411.95 6151.87,6411.95 6182.29,6411.95 6029.45,6415.95 6059.87,6415.95 6090.29,6415.95 4693.87,6425.95 4284.42,6527.95 4317.87,6527.95 4349.87,6527.95 4379.87,6527.95 4409.87,6527.95 4445.87,6527.95 4483.87,6527.95 4523.1,6527.95 4553.87,6527.95 4707.87,6561.95 4284.42,6563.94 4445.87,6569.95 4543.87,6573.95 4284.42,6599.93 4450.94,6607.95 4481.36,6607.95 4511.78,6607.95 4542.2,6607.95 4572.62,6607.95 4603.05,6607.95 4633.47,6607.95 4663.89,6607.95 4694.31,6607.95 4721.87,6607.95 4749.76,6607.95 4737.87,6635.95 4284.42,6637.95 4314.84,6637.95 4345.26,6637.95 4375.68,6637.95 4406.1,6637.95 4436.52,6637.95 4466.94,6637.95 4497.36,6637.95 4527.78,6637.95 4558.2,6637.95 4588.62,6637.95 4619.05,6637.95 4649.47,6637.95 4679.89,6637.95 4710.31,6637.95
VDD_3.3V: C4.2 C5.2 C6.2 C8.2 C9.2 C10.2 C15.2 C16.2 C20.1 C28.1 H1.1 H4.11 L2.1 P1.14 P1.16 R1.2 R3.2 R5.2 R6.2 R7.2 R9.2 U2.2 U3.5 U3.8 U4.1 U4.20 U4.21 U4.24 U4.36 U4.48 U12.5 U13.4 U13.16 | length 2147.2
  Top Layer w10: H1.1@4462.05,4305.18 4469.87,4297.35 4469.87,4251.95 4483.36,4238.47 v1(4501.87,4238.47) ; U2.2@4587.87,3468.71 4591.79,3464.8 v1(4625.03,3464.8) ; v1(4731.87,4729.41) 4737.45,4723.84 4807.87,4723.84 4816.48,4732.44 C5.2@4816.48,4748.2 4817.48,4749.2 C4.2@4817.48,4794.2 4819.63,4796.36 U4.48@4819.63,4821.93 ; U4.1@4878.68,4762.88 4877.87,4762.07 4877.87,4729.95 4881.96,4725.87 v1(4881.96,4709.9) ; v1(5063.87,4077.95) 5098.3,4077.95 C6.2@5101.83,4074.41 5124.34,4074.41 5126.6,4076.68 U3.5@5149.9,4076.68 ; C10.2@5145.52,5112.01 C9.2@5145.53,5065.83 5145.53,5056.3 5153.87,5047.95 5153.87,5038.87 U4.24@5154.27,5038.47 5116.39,5038.47 5095.87,5017.95 5095.87,4985.95 5102.94,4978.88 5153.74,4978.88 U4.21@5154.27,4979.41 U4.20@5154.27,4959.73 ; U3.8@5160.23,4007.31 5160.35,4007.2 C8.2@5160.35,3967.63 5161.87,3966.11 v1(5161.87,3931.95) ; P1.16@5459.87,6216.14 5509.68,6216.14 5539.87,6185.95 5539.87,6001.95 v1(5537.87,5999.95) ; H4.11@5561.64,5417.44 5561.64,5368.19 v1(5561.87,5367.95)
  Top Layer w17: v1(4823.87,5151.74) 4854.55,5151.74 C16.2@4854.9,5152.09 ; v1(4823.87,5197.95) 4855.73,5197.95 C15.2@4856.04,5198.26 ; v1(4855.87,5097.95) 4878.25,5097.95 U4.36@4878.57,5097.63 ; v1(4934.7,5989.91) 4962.85,5989.91 L2.1@4963.21,5989.55 4968.48,5994.82 v1(4968.48,6024.21) ; v1(4983.87,3869.95) 4983.87,3820.39 C28.1@4984.31,3819.95 4984.31,3755.88 U13.16@4984.05,3755.62 ; U13.4@5134.05,3529.44 5134.05,3568.13 5155.87,3589.95 v1(5163.87,3589.95) ; v1(5141.5,5141.59) 5145.52,5137.58 C10.2@5145.52,5112.01 ; C20.1@5323.69,5834.77 v1(5358.15,5834.77) ; U12.5@5331.53,5897.77 5357.78,5897.77 v1(5358.15,5897.41) ; v1(5358.15,5806.81) v1(5358.15,5834.77) ; v1(5358.15,5864.51) v1(5358.15,5834.77) ; P1.14@5359.87,6216.14 P1.16@5459.87,6216.14 ; R9.2@5401,5895 5401,5863.55 v1(5395.01,5857.55) v1(5422.36,5857.55) ; R3.2@5522.85,3428.61 5586.53,3428.61 v1(5587.87,3429.95) 5655.5,3429.95 R1.2@5656.84,3428.61 5660.18,3431.95 5695.87,3431.95 5727.87,3463.95 5783.48,3463.95 R5.2@5787.04,3467.51 ; v1(5969.87,3507.95) 5970.87,3506.95 R6.2@5970.87,3466.68 ; R7.2@6137.67,3471.15 6137.87,3471.35 v1(6137.87,3513.95)
VDDA: C40.1 C47.1 C50.1 C52.1 C56.1 C57.1 C76.1 C77.1 C80.1 C82.1 L2.2 U14.5 U14.6 U21.5 U21.6 U28.5 U28.6 U35.5 U35.6 | length 1186.1
  Top Layer w15: v1(3335.87,4883.95) 3335.08,4883.16 C52.1@3335.08,4822.39 3402.13,4822.39 C50.1@3402.66,4821.86 ; C47.1@3340.4,5636.29 3342,5634.68 C40.1@3408.23,5634.68 ; v1(3491.47,5723.65) 3470.38,5702.57 3470.38,5673.39 3471.47,5672.31 U14.5@3471.47,5629.01 U14.6@3497.06,5629.01 ; U21.6@3492.12,4745.59 U21.5@3466.53,4745.59 3466.53,4806.66 3468.55,4806.66 3470.9,4809.01 cw(c3493.87,4797.95) 3482.82,4820.92 v1(3492.18,4830.29) ; C57.1@5018.32,5857.03 5018.48,5857.18 C56.1@5018.48,5925.05 5018.48,5989.39 L2.2@5018.32,5989.55 ; v1(6401.87,5667.95) 6423.87,5667.95 6451.87,5639.95 6451.87,5620.72 C82.1@6456.33,5616.26 C80.1@6456.36,5548.62 6460.66,5544.32 U35.5@6460.66,5482.24 U35.6@6435.07,5482.24 ; U28.6@6421.3,4604.76 U28.5@6446.89,4604.76 6446.89,4667.76 C76.1@6448.69,4669.56 6448.69,4737.21 C77.1@6449.22,4737.73 6449.22,4789.29 v1(6449.87,4789.95)
  Top Layer w30: C47.1@3340.4,5636.29 3340.4,5559.43 v1(3341.87,5557.95) ; C57.1@5018.32,5857.03 5080.95,5857.03 v1(5081.87,5857.95)
VSC_OUT: C37.1 C38.1 Q4.1 Q4.2 Q4.3 Q10.5 Q10.6 Q10.7 Q10.8 R36.1 U20.6 U37.3 | length 1291.4
  Top Layer w20: Q10.8@3777.19,3653.95 Q10.7@3827.19,3653.95 Q10.6@3877.19,3653.95 ; Q4.1@3778.12,3762.12 Q4.2@3828.12,3762.12 Q4.3@3878.12,3762.12 3878.12,3716.68 R36.1@3869.92,3708.48 3877.19,3701.2 Q10.6@3877.19,3653.95 ; Q10.8@3852.19,3558.87 3859.27,3565.95 4186.24,3565.95 4225.02,3604.72 U20.6@4225.02,3654.86 4225.02,3687.04 4236.44,3698.47 4236.44,3700.47 ; Q10.5@3927.19,3653.95 Q10.6@3877.19,3653.95 ; C37.1@4231.63,3731.35 C38.1@4231.63,3801.35
  Top Layer w24: C37.1@4231.63,3731.35 4236.44,3726.54 4236.44,3700.47
  Top Layer w70: U37.3@3526.82,3573.94 3837.12,3573.94 Q10.8@3852.19,3558.87
VSC_OUT2: C59.1 C60.1 Q7.1 Q7.2 Q7.3 Q13.5 Q13.6 Q13.7 Q13.8 R41.1 U27.6 U36.3 | length 1457.2
  Top Layer w20: C60.1@5787.07,5603.94 5787.07,5670.2 C59.1@5784.52,5672.75 5790.54,5678.77 5790.54,5751.06 U27.6@5793.55,5754.07 5790.54,5757.09 5790.54,5830.83 5814.63,5854.92 6137.66,5854.92 Q13.8@6156.71,5835.88 ; Q13.6@6131.71,5740.8 6131.71,5714.54 6142.97,5703.27 R41.1@6142.97,5684.02 6143.92,5683.07 6143.92,5660.16 6133.24,5649.48 Q7.3@6133.24,5601 6175.21,5601 Q7.2@6181.23,5607.02 ; Q7.2@6183.24,5601 6225.21,5601 Q7.1@6231.23,5607.02
  Top Layer w70: Q13.8@6156.71,5835.88 6179.77,5858.94 6292.5,5858.94 6342.7,5909.13 6342.7,6035.6 6442.39,6135.29 U36.3@6548.62,6135.29
pads on no net: CN1.5 CN2.5 CN3.4 CN3.5 H1.5 H1.6 H1.7 H1.8 H1.9 H2.11 H2.12 H3.9 H3.12 H4.1 SCREW1.1 SCREW2.1 SCREW3.1 SCREW4.1 U3.2 U3.3 U3.9 U3.10 U3.11 U12.4 U13.7 U13.8 U13.9 U13.10 U13.11 U13.12 U13.13 U13.14 U13.15 U14.1 U21.1 U28.1 U35.1 U36.4 U36.5 U37.4 U37.5 USB1.A4 USB1.A8 USB1.A9 USB1.B4 USB1.B8 USB1.B9

## Polygon pours and split planes (outlines as drawn)
DC_IN+ on Top Layer (solid, remove dead copper, pour order 0): 3629.61,7112.11 3629.61,6336.82 3179.72,6336.82 3179.72,6586.35 3091.09,6674.98 3091.09,6932.01 3089.94,6933.15 3093.96,6937.17 3190.34,6937.17 3259.73,7006.56 3259.73,7112.11
DC_IN+ on Top Layer (solid, remove dead copper, pour order 2): 3286.72,6334.8 3248.94,6334.8 3246.92,6336.82 3284.7,6336.82
$1N365 on Top Layer (solid, remove dead copper, pour order 4): 3730.46,7111.85 3732.46,7109.84 3953.33,7109.84 3953.33,6652.9 4254.51,6652.9 4254.51,6354.18 3803.44,6354.18 3800.73,6356.89 3800.73,6744.41 3802.74,6746.42 3712.39,6746.42 3710.38,6748.43 3710.38,7111.85
VCC_12V on Inner2 (solid, remove dead copper): 4265.87,6667.95 6427.88,6658.84 6427.88,5840.82 6511.87,5756.83 6511.87,3549.95 5649.87,3549.95 5645.96,3553.87 5645.96,6235.87 5579.87,6301.95 4693.87,6301.95 4683.87,6291.95 4683.87,5797.95 4677.87,5791.95 4373.87,5791.95 4373.87,3279.95 4321.87,3227.95 3699.87,3227.95 3615.87,3311.95 3615.87,4005.95 3613.87,4003.95 3441.87,4003.95 3211.87,4233.95 3211.87,5809.95 3223.87,5809.95 3665.87,6251.95 3669.87,6247.95 4265.87,6250.82
VCC_12V on Inner2 (solid, remove dead copper): 5007.87,6315.95 5007.87,6166.14 4655.68,6166.14 4653.87,6167.95 4653.87,6309.95 4659.87,6315.95
VCC_12V on Top Layer (solid, remove dead copper, pour order 6): 4267.87,6663.95 4279.87,6663.95 4283.87,6659.95 4775.87,6659.95 4775.87,6535.95 4723.87,6535.95 4715.48,6527.56 4563.48,6527.56 4543.87,6507.95 4439.87,6507.95 4437.87,6509.95 4269.87,6509.95 4267.87,6511.95
VCC_12V on Top Layer (solid, remove dead copper, pour order 10): 3665.87,6147.95 3683.87,6147.95 3690.15,6141.68 3995.87,6141.68 4003.87,6133.68 4003.87,6005.95 4005.87,6007.95 4195.87,6007.95 4198.77,6010.85 4198.77,6133.95 4413.87,6133.95 4413.87,6033.95 4437.87,6009.95 4435.87,6007.95 4379.87,6007.95 4329.36,5957.44 4329.36,5657.95 3981.87,5657.95 3949.87,5625.95 3665.87,5625.95
VCC_12V on Top Layer (solid, remove dead copper, pour order 14): 3719.87,5001.95 3741.87,5023.95 3741.87,5025.95 3955.87,5025.95 3981.87,4999.95 3981.87,4915.95 3991.87,4905.95 4283.2,4905.95 4293.15,4896 4293.15,4779.23 4283.87,4769.95 3739.87,4769.95 3719.87,4789.95
VCC_12V on Top Layer (solid, remove dead copper, pour order 16): 3697.87,4063.95 3732.82,4098.9 3948.93,4098.9 3969.87,4077.95 3969.87,4005.95 3975.87,3999.95 4275.87,3999.95 4293.87,3981.95 4293.87,3865.95 4275.87,3847.95 3983.87,3847.95 3969.87,3833.95 3969.87,3811.95 3961.87,3803.95 3699.87,3803.95 3697.87,3805.95
VCC_12V on Top Layer (solid, remove dead copper, pour order 18): 5691.87,3775.95 5717.87,3801.95 6020.78,3801.95 6054.78,3835.95 6239.87,3835.95 6261.87,3813.95 6267.87,3813.95 6267.87,3625.95 6241.87,3599.95 6053.87,3599.95 6029.87,3623.95 6029.87,3645.95 6019.87,3655.95 5693.87,3655.95 5691.87,3657.95
VCC_12V on Top Layer (solid, remove dead copper, pour order 20): 5705.87,4525.95 5742.91,4562.99 6022.91,4562.99 6041.87,4581.95 6041.87,4672.27 6059.96,4690.35 6270.42,4690.35 6270.42,4470.5 6249.87,4449.95 6069.87,4449.95 6039.87,4419.95 5711.87,4419.95 5705.87,4425.95
VCC_12V on Top Layer (solid, remove dead copper, pour order 22): 6019.87,6437.95 6231.87,6437.95 6247.87,6421.95 6247.87,6281.95 6217.87,6251.95 6031.87,6251.95 6001.87,6281.95 6001.87,6419.95
VCC_12V on Top Layer (solid, remove dead copper, pour order 24): 5701.96,5529.02 5732.89,5559.95 6253.87,5559.95 6277.87,5535.95 6277.87,5347.95 6245.87,5315.95 6067.87,5315.95 6039.87,5343.95 6039.87,5393.95 6015.87,5417.95 5725.87,5417.95 5701.96,5437.86
PGND on Inner1 (solid, remove dead copper): 3157.81,3286.45 3157.71,3286.35 3156.12,3288.2
PGND on Top Layer (solid, remove dead copper, pour order 26): 3637.87,6735.95 3729.87,6735.95 3733.87,6731.95 3733.87,6597.95 3775.87,6555.95 3775.87,6463.95 3769.87,6457.95 3641.87,6457.95 3635.87,6463.95 3635.87,6731.95 3637.87,6733.95
PGND on Top Layer (solid, remove dead copper, pour order 28): 4247.24,6367.02 4342.8,6367.02 4353.87,6355.95 4353.87,6255.95 4349.87,6251.95 4251.87,6251.95 4247.87,6255.95 4247.87,6361.95 4243.87,6365.95 4246.17,6365.95
PGND on Top Layer (solid, remove dead copper, pour order 32): 4545.87,6497.95 4577.87,6529.95 4609.87,6529.95 4613.87,6525.95 4707.87,6525.95 4719.87,6513.95 4719.87,6477.95 4711.87,6469.95 4692.09,6469.95 4677.96,6455.82 4651.74,6455.82 4639.87,6443.95 4571.87,6443.95 4545.87,6469.95
PGND on Top Layer (solid, remove dead copper, pour order 34): 3086.81,6528.88 3165.34,6528.88 3165.34,6311.42 3163.87,6309.95 3617.87,6309.95 3635.87,6291.95 3635.87,6049.95 3621.87,6035.95 3097.87,6035.95 3083.87,6049.95
PGND on Top Layer (solid, remove dead copper, pour order 36): 3165.34,6529.68 3166.14,6528.88 3165.34,6528.88
PGND on Top Layer (solid, remove dead copper, pour order 40): 4255.87,5271.95 4274,5290.08 4324.73,5290.04 4324.73,5190.81 4301.87,5167.95 4277.87,5167.95 4261.87,5151.95 4261.87,5073.95 4239.87,5051.95 4215.87,5051.95 4177.87,5089.95 4177.87,5195.95 4181.87,5199.95 4253.87,5199.95 4255.87,5201.95
VDD_3.3V on Inner2 (solid, remove dead copper): 4849.62,6069.7 5006.28,6069.7 5006.3,6069.72 5542.11,6069.72 5613.87,5997.95 5613.87,4001.95 5621.87,3993.95 5621.87,3569.95 5661.87,3529.95 6223.87,3529.95 6347.87,3405.95 6347.87,3225.95 6335.87,3213.95 4453.87,3213.95 4409.87,3257.95 4409.87,5715.95 4415.87,5721.95 4695.87,5721.95 4741.87,5767.95 4741.87,6036.34 4775.25,6069.72 4849.64,6069.72
VCC_12V on Top Layer (solid, remove dead copper, pour order 42): 4651.87,6445.95 4776.56,6445.95 4776.56,6341.08 5008.83,6341.72 5008.83,6166.14 4651.87,6166.14
DGND on Inner4 (solid, remove dead copper): 4377.87,7111.95 4379.87,7113.95 4379.87,7109.95
DGND on Inner4 (solid, remove dead copper): 4379.87,6805.95 4379.87,7109.95 6935.87,7109.95 6979.87,7065.95 6979.87,6407.95 6973.87,6413.95 6325.87,6413.95 6297.87,6385.95 6297.87,3725.95 6405.87,3617.95 6405.87,3251.95 6366.21,3212.29 3849.54,3212.29 3661.87,3399.95 3661.87,6087.95
AGND on Inner3 (solid, remove dead copper): 3201.87,4715.95 3201.87,5688.36 3271.22,5759.95 3538.3,5759.95 3581.87,5716.38 3581.87,4727.95 3483.87,4629.95 3287.87,4629.95
AGND on Inner3 (solid, remove dead copper): 4445.87,5945.62 4459.51,5945.95 4990.76,5944.98 4990.76,5842.06 4445.87,5843.95
PGND on Inner3 (solid, remove dead copper): 3661.87,3259.95 3661.87,6031.95 3655.87,6037.95 3089.98,6037.95 3089.98,7107.95 6951.87,7107.95 6989.87,7069.95 6989.87,6393.95 6985.87,6389.95 6317.87,6389.95 6309.06,6381.14 6317.87,3558.76 5645.87,3563.81 5651.91,5954.24 4361.66,5954.24 4361.66,3277.95 4339.66,3255.95 3665.87,3255.95
AGND on Inner3 (solid, remove dead copper): 6937.87,5713.95 6981.87,5669.95 6981.87,3305.32 6890.87,3214.32 4415.5,3214.32 4385.87,3243.95 4385.87,5891.95 4435.87,5941.95 5633.87,5941.95 5635.87,5939.95 5635.87,3557.95 5637.87,3555.95 6317.87,3555.95 6321.87,3559.95 6321.87,5713.95